# Altium PCB Rad_v3 Interposer.PcbDoc
Units mm, origin at the board's own origin, x right, y up, seen from the top; angles counter-clockwise.
Board outline 10 x 15.5 mm, 2 copper layers (Top Layer, Bottom Layer); 4 components, 3 nets, 82 pads, 26 vias.
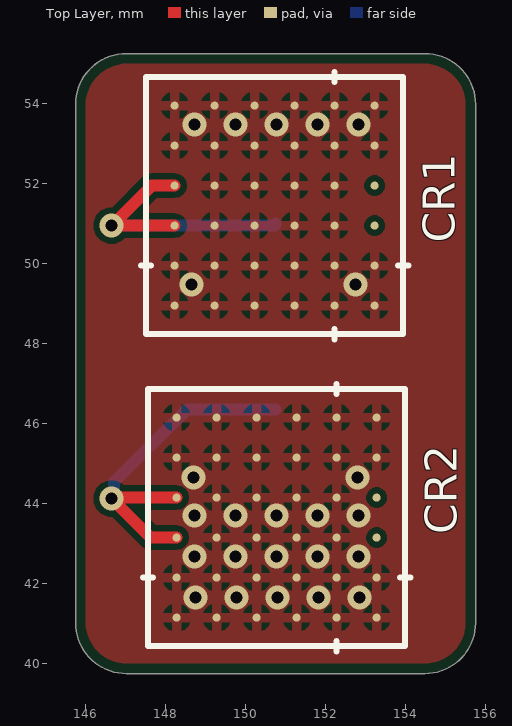
[diagram p0: Top Layer view]
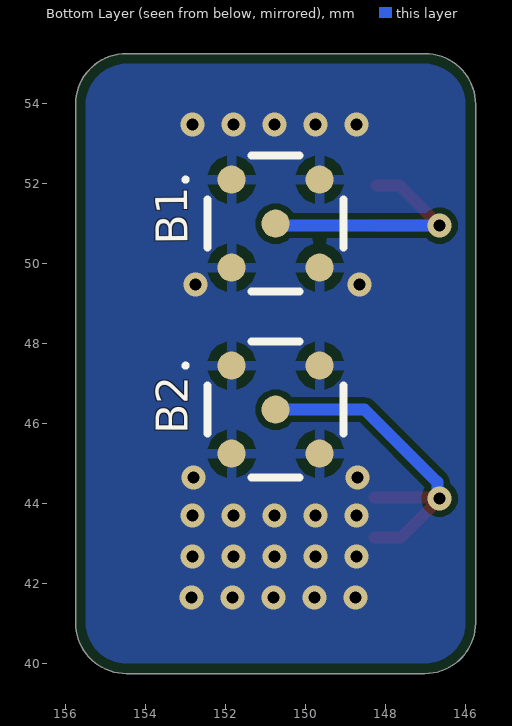
[diagram p1: Bottom Layer view, seen from below]

## Layer stack, top to bottom
Top Solder: solder mask 0.0102, Solder Resist, Dk 3.5
Top Layer: signal copper 0.0356
Dielectric 1: dielectric 0.32, FR-4, Dk 4.8
Bottom Layer: signal copper 0.0356
Bottom Solder: solder mask 0.0102, Solder Resist, Dk 3.5

## Board outline
145.75,41.02 145.75,53.98 cw(c147.02,53.98) 147.02,55.25 154.48,55.25 cw(c154.48,53.98) 155.75,53.98 155.75,41.02 cw(c154.48,41.02) 154.48,39.75 147.02,39.75 cw(c147.02,41.02)

## Design rules (kind name [scope] priority, off if disabled: settings)
BoardOutlineClearance [All] p1: gap=0.254 ignorepadtopadclearanceinfootprint=FALSE except(0: Arc-SplitContinuation Track-SplitContinuation SMDPad-SplitContinuation THPad-SplitContinuation Via-SplitContinuation Fill-SplitContinuation Poly-SplitContinuation Region-SplitContinuation Text-SplitContinuation)
Clearance [All] p1: gap=0.152 ignorepadtopadclearanceinfootprint=FALSE
HoleSize [All] p1: absolutevalues=TRUE maxlimit=6.2 minlimit=0.3 maxpercent=80.000 minpercent=20.000
MinimumAnnularRing [All] p1: minimumring=0.15
MinimumSolderMaskSliver [All] p1: minsoldermaskwidth=0.1
PolygonConnect ViaConnect [IsVia] p1: connectstyle=Direct reliefconductorwidth=0.254 reliefentries=4 polygonreliefangle="90 Angle" airgapwidth=0.254
PolygonConnect [All] p2: connectstyle=Relief reliefconductorwidth=0.254 reliefentries=4 polygonreliefangle="90 Angle" airgapwidth=0.254
RoutingVias [All] p1: holewidth=0.25 width=0.6 viastyle="Through Hole" minholewidth=0.25 minwidth=0.5 maxholewidth=1 maxwidth=5
SilkToSilkClearance [All] p1: silktosilkclearance=0.1
SilkToSolderMaskClearance [IsPad] p1: minsilkscreentomaskgap=0.1 clearancetoexposedcopper=TRUE
SolderMaskExpansion Tent [IsVia] p1: expansion=0 istentingtop=TRUE
SolderMaskExpansion [All] p2: expansion=0.051 istentingtop=FALSE
SupplyNets "Schematic Supply Nets_2" [InNet('VAN2')] p1: voltage=0.000
SupplyNets "Schematic Supply Nets_1" [InNet('VAN1')] p2: voltage=0.000
SupplyNets "Schematic Supply Nets" [InNet('VBR')] p3: voltage=0.000
Width [All] p1: maxlimit=25.4 minlimit=0.15 preferedwidth=0.3
26 further rules are at their usual default settings.

## Components (designator, comment, footprint, x,y, rotation, side; value= is the part's Value field where it differs from the comment)
B1 "S14160-3050HS" S141603050HS 150.75,51 r180 bottom
B2 "S14160-3050HS" S141603050HS 150.75,46.35 r180 bottom
CR1 "MICROFJ-60035-TSV-TR" MicroFJ-60035-TSV_OSI 150.725,51.45 r0 top
CR2 "MICROFJ-60035-TSV-TR" MicroFJ-60035-TSV_OSI 150.775,43.65 r0 top

## Footprints (in the part's own frame and the unit in brackets; to place one, negate y for a bottom-side part, rotate by r counter-clockwise, add the part's x,y. Pads: shape width x height; smd on the part's side, far side on the other; paste and mask are expansions set on the pad)
MicroFJ-60035-TSV_OSI [mm]
  round 0.203 smd paste+0 mask+0: A1(-2.5,2.5) A2(-1.5,2.5) A3(-0.5,2.5) A4(0.5,2.5) A5(1.5,2.5) A6(2.5,2.5) B1(-2.5,1.5) B2(-1.5,1.5) B3(-0.5,1.5) B4(0.5,1.5) B5(1.5,1.5) B6(2.5,1.5) C1(-2.5,0.5) C2(-1.5,0.5) C3(-0.5,0.5) C4(0.5,0.5) C5(1.5,0.5) C6(2.5,0.5) D1(-2.5,-0.5) D2(-1.5,-0.5) D3(-0.5,-0.5) D4(0.5,-0.5) D5(1.5,-0.5) D6(2.5,-0.5) E1(-2.5,-1.5) E2(-1.5,-1.5) E3(-0.5,-1.5) E4(0.5,-1.5) E5(1.5,-1.5) E6(2.5,-1.5) F1(-2.5,-2.5) F2(-1.5,-2.5) F3(-0.5,-2.5) F4(0.5,-2.5) F5(1.5,-2.5) F6(2.5,-2.5)
  silkscreen extent -3.34,-3.34 3.34,3.34, body extent -3.09,-3.09 3.09,3.09, height 0.79
S141603050HS [mm]
  round 0.7 smd: A1(-1.1,1.1) A3(-1.1,-1.1) B2(0,0) C1(1.1,1.1) C3(1.1,-1.1)
  silkscreen extent -2.3,-1.7 1.7,1.7

## Part data
B1 B2: "The S14160 series achieve higher PDE (photon detection efficiency) and lower operation voltage than other MPPC to adapt for PET and radiation monitor application.-Higher PDE: 50% at p, Vop=VBR + 2.7 V", Manufacturer_Name=Hamamatsu, Datasheet Link=https://www.hamamatsu.com/content/dam/hamamatsu-photonics/sites/documents/99_SALES_LIBRARY/ssd/s14160_s14161_series_kapd1064e.pdf, Geometry.Height=1.55mm, Manufacturer_Part_Number=S14160-3050HS
CR1 CR2: "Description", Manufacturer_Name=onsemi, Copyright="Copyright (C) 2026 Ultra Librarian. All rights reserved.", Manufacturer_Part_Number=MICROFJ-60035-TSV-TR, RefDes=RefDes, Type=Type

## Via types
v1: diameter 0.6, hole 0.3, Top Layer to Bottom Layer, tented both sides, 26 vias

## Nets (pads, with @x,y where several pads share a name; then routed paths per layer and width w, separated by ;. In a path a pad name is that pad's centre, name@x,y a point inside that pad or via, vN(x,y) a via of type N, cw(c..) or ccw(c..) an arc to the next point about the centre after c; other vN are vias at no path point)
VAN1: B1.B2 CR1.C1 CR1.D1 | length 7.7
  Top Layer w0.3: CR1.D1 v1(146.65,50.95) 147.65,51.95 CR1.C1
  Bottom Layer w0.3: v1(146.65,50.95) 150.7,50.95 ccw(c150.7,51) B1.B2
VAN2: B2.B2 CR2.C1 CR2.D1 | length 8.9
  Top Layer w0.3: CR2.D1 147.625,43.15 v1(146.65,44.125) 146.675,44.15 CR2.C1
  Bottom Layer w0.3: v1(146.65,44.125) 146.707,44.182 146.707,44.534 148.523,46.35 B2.B2
VBR: B1.A1 B1.A3 B1.C1 B1.C3 B2.A1 B2.A3 B2.C1 B2.C3 CR1.A1 CR1.A2 CR1.A3 CR1.A4 CR1.A5 CR1.A6 CR1.B1 CR1.B2 CR1.B3 CR1.B4 CR1.B5 CR1.B6 CR1.C2 CR1.C3 CR1.C4 CR1.C5 CR1.D2 CR1.D3 CR1.D4 CR1.D5 CR1.E1 CR1.E2 CR1.E3 CR1.E4 CR1.E5 CR1.E6 CR1.F1 CR1.F2 CR1.F3 CR1.F4 CR1.F5 CR1.F6 CR2.A1 CR2.A2 CR2.A3 CR2.A4 CR2.A5 CR2.A6 CR2.B1 CR2.B2 CR2.B3 CR2.B4 CR2.B5 CR2.B6 CR2.C2 CR2.C3 CR2.C4 CR2.C5 CR2.D2 CR2.D3 CR2.D4 CR2.D5 CR2.E1 CR2.E2 CR2.E3 CR2.E4 CR2.E5 CR2.E6 CR2.F1 CR2.F2 CR2.F3 CR2.F4 CR2.F5 CR2.F6
  other v1: 148.75,41.65 149.775,41.65 150.8,41.65 151.825,41.65 152.85,41.65 148.725,42.675 149.75,42.675 150.775,42.675 151.8,42.675 152.825,42.675 148.725,43.7 149.75,43.7 150.775,43.7 151.8,43.7 152.825,43.7 148.7,44.65 152.8,44.65 148.65,49.475 152.75,49.475 148.725,53.475 149.75,53.475 150.775,53.475 151.8,53.475 152.825,53.475
pads on no net: CR1.C6 CR1.D6 CR2.C6 CR2.D6

## Polygon pours and split planes (outlines as drawn)
VBR on Top Layer "VBR_L01_P001" (solid, remove dead copper, pour order 1): 145.261,55.78 156.897,55.821 156.952,39.466 145.289,39.384
VBR on Bottom Layer "VBR_L02_P004" (solid, remove dead copper, pour order 4): 145.475,55.65 156.225,55.575 156.05,39.35 145.3,39.375

## Silkscreen, mask and mechanical layers (free items; w line width, h text height)
Mechanical 1:
  lines w0.254: 145.75,41.02 ccw(c147.02,41.02) 147.02,39.75 154.48,39.75 ccw(c154.48,41.02) 155.75,41.02 155.75,53.98 ccw(c154.48,53.98) 154.48,55.25 154,55.25 147.02,55.25 ccw(c147.02,53.98) 145.75,53.98 145.75,41.02